# Altium PCB Diff_Pair.PcbDoc
Units mm, origin at the board's own origin, x right, y up, seen from the top; angles counter-clockwise.
Board outline 160 x 20 mm, 4 copper layers (Top Layer, GND 1, GND 2, Bottom Layer), stack 1.625 mm thick; 2 components, 3 nets, 12 pads, 62 vias.
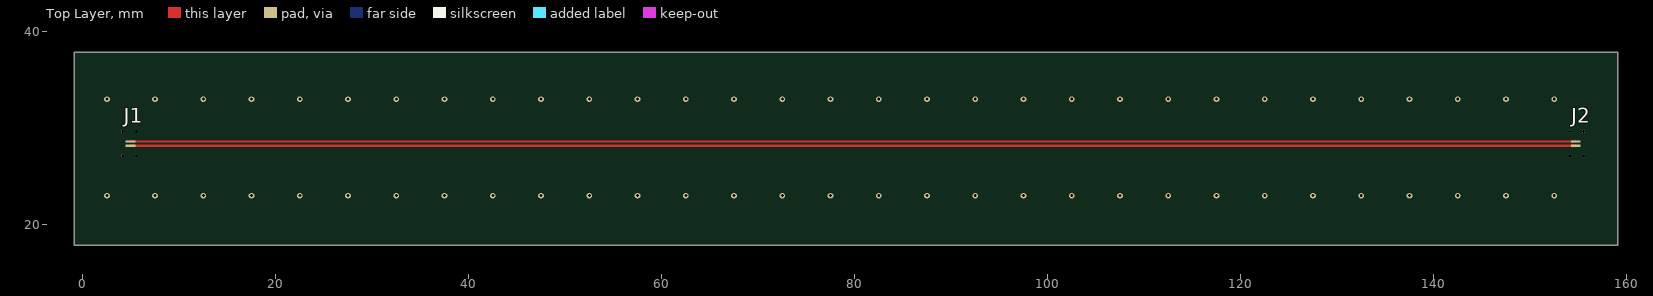
[diagram p0: Top Layer view]
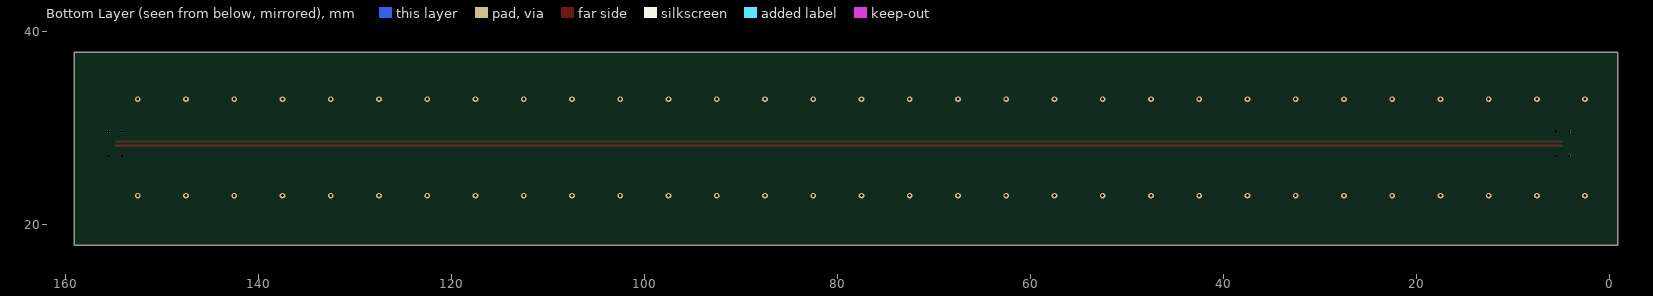
[diagram p1: Bottom Layer view, seen from below]
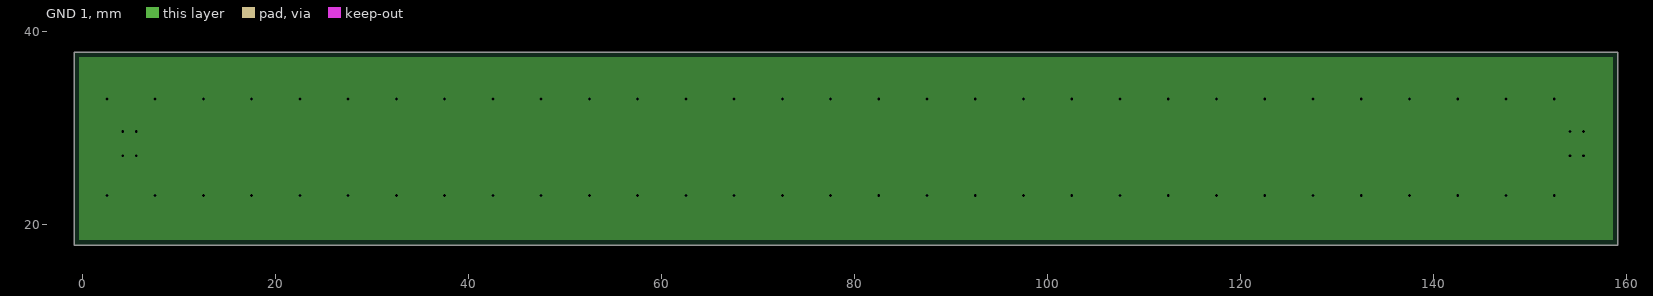
[diagram p2: GND 1, clearances drawn from the general rule]
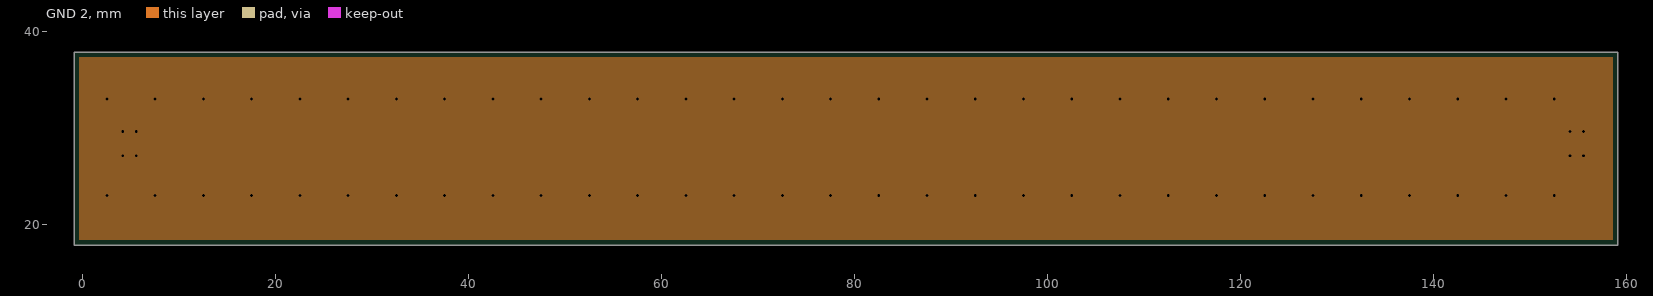
[diagram p3: GND 2, clearances drawn from the general rule]

## Layer stack, top to bottom
Top Solder: solder mask 0.0102, Solder Resist, Dk 3.5
Top Layer: signal copper 0.035
Dielectric 2: prepreg 0.21, PP-006, Dk 4.4
GND 1: plane copper 0.035, net GND
Dielectric 1: core 1.065, FR-4, Dk 4.6
GND 2: plane copper 0.035, net GND
Dielectric 3: prepreg 0.21, PP-006, Dk 4.4
Bottom Layer: signal copper 0.035
Bottom Solder: solder mask 0.0102, Solder Resist, Dk 3.5

## Board outline
-0.869,17.907 -0.869,37.907 159.131,37.907 159.131,17.907

## Design rules (kind name [scope] priority, off if disabled: settings)
Clearance [All] p1: gap=0.15 ignorepadtopadclearanceinfootprint=FALSE
DiffPairsRouting [InDifferentialPairClass('All Differential Pairs')] p1: maxlimit=0.22 minlimit=0.19 mostfreqgap=0.203 toplayer_minwidth=0.23 toplayer_maxwidth=0.26 toplayer_prefwidth=0.246 bottomlayer_maxgap=0.203 bottomlayer_minwidth=0.23 bottomlayer_maxwidth=0.26 bottomlayer_prefwidth=0.246 maxuncoupledlength=3
MinimumSolderMaskSliver [All] p1: minsoldermaskwidth=0.1
ParallelSegment [All] p1: limit=254 gap=0.254
PlaneClearance [All] p1: clearance=0.3
PlaneConnect [All] p1: planeconnectstyle=Direct reliefexpansion=0.508 reliefentries=4 reliefconductorwidth=0.254 reliefairgap=0.254
PolygonConnect [All] p1: connectstyle=Relief reliefconductorwidth=0.254 reliefentries=4 polygonreliefangle="90 Angle" airgapwidth=0.254
RoutingVias [InDifferentialPairClass('All Differential Pairs')] p1: holewidth=0.3 width=0.6 viastyle="Through Hole" minholewidth=0.3 minwidth=0.6 maxholewidth=0.711 maxwidth=1.27
SolderMaskExpansion [All] p1: expansion=0 istentingtop=FALSE
SupplyNets "Schematic Supply Nets" [InNet('GND')] p1: voltage=0.000
Width [All] p1: maxlimit=0.5 minlimit=0.15 preferedwidth=0.246
26 further rules are at their usual default settings.

## Classes and differential pairs
differential pair C: +C_P -C_N

## Components (designator, comment, footprint, x,y, rotation, side; value= is the part's Value field where it differs from the comment)
J1 "LAUNCH" LAUNCH_FP 4.873,28.413 r0 top
J2 "LAUNCH" LAUNCH_FP 154.873,28.413 r180 top

## Footprints (in the part's own frame and the unit in brackets; to place one, negate y for a bottom-side part, rotate by r counter-clockwise, add the part's x,y. Pads: shape width x height; smd on the part's side, far side on the other; paste and mask are expansions set on the pad)
LAUNCH_FP [mm]
  rect 1x0.246 smd: 1(0.1,0.224) 2(0.1,-0.224)
  rect 0.2x0.3 hole 0.3: 3(-0.7,-1.25) 3(-0.7,1.25) 3(0.7,-1.25) 3(0.7,1.25)

## Via types
v1: diameter 0.6, hole 0.3, Top Layer to Bottom Layer, 62 vias

## Nets (pads, with @x,y where several pads share a name; then routed paths per layer and width w, separated by ;. In a path a pad name is that pad's centre, name@x,y a point inside that pad or via, vN(x,y) a via of type N, cw(c..) or ccw(c..) an arc to the next point about the centre after c; other vN are vias at no path point)
C_N: J1.2 J2.1 | length 149.8
  Top Layer w0.246: J1.2 J2.1
C_P: J1.1 J2.2 | length 149.8
  Top Layer w0.246: J1.1 J2.2
GND: J1.3 J2.3
  other v1: 2.53,23.024 7.53,23.024 12.53,23.024 17.53,23.024 22.53,23.024 27.53,23.024 32.53,23.024 37.53,23.024 42.53,23.024 47.53,23.024 52.53,23.024 57.53,23.024 62.53,23.024 67.53,23.024 72.53,23.024 77.53,23.024 82.53,23.024 87.53,23.024 92.53,23.024 97.53,23.024 102.53,23.024 107.53,23.024 112.53,23.024 117.53,23.024 122.53,23.024 127.53,23.024 132.53,23.024 137.53,23.024 142.53,23.024 147.53,23.024 152.53,23.024 2.53,33.024 7.53,33.024 12.53,33.024 17.53,33.024 22.53,33.024 27.53,33.024 32.53,33.024 37.53,33.024 42.53,33.024 47.53,33.024 52.53,33.024 57.53,33.024 62.53,33.024 67.53,33.024 72.53,33.024 77.53,33.024 82.53,33.024 87.53,33.024 92.53,33.024 97.53,33.024 102.53,33.024 107.53,33.024 112.53,33.024 117.53,33.024 122.53,33.024 127.53,33.024 132.53,33.024 137.53,33.024 142.53,33.024 147.53,33.024 152.53,33.024

## Polygon pours and split planes (outlines as drawn)
GND on GND 1 (split plane): 158.621,18.417 -0.359,18.417 -0.359,37.397 158.621,37.397
GND on GND 2 (split plane): 158.621,18.417 -0.359,18.417 -0.359,37.397 158.621,37.397